# Altium PCB OmniCore_SDR.PcbDoc (part 12 of 13)
Units mil, origin at the board's own origin, x right, y up, seen from the top; angles counter-clockwise.
Board outline 4724.72 x 2755.91 mil, 8 copper layers (Top, GND 1, Layer 1, Layer 2, GND 2, Layer 3, Power, Bottom), stack 40.468 mil thick; 530 components, 427 nets, 2315 pads, 1715 vias.
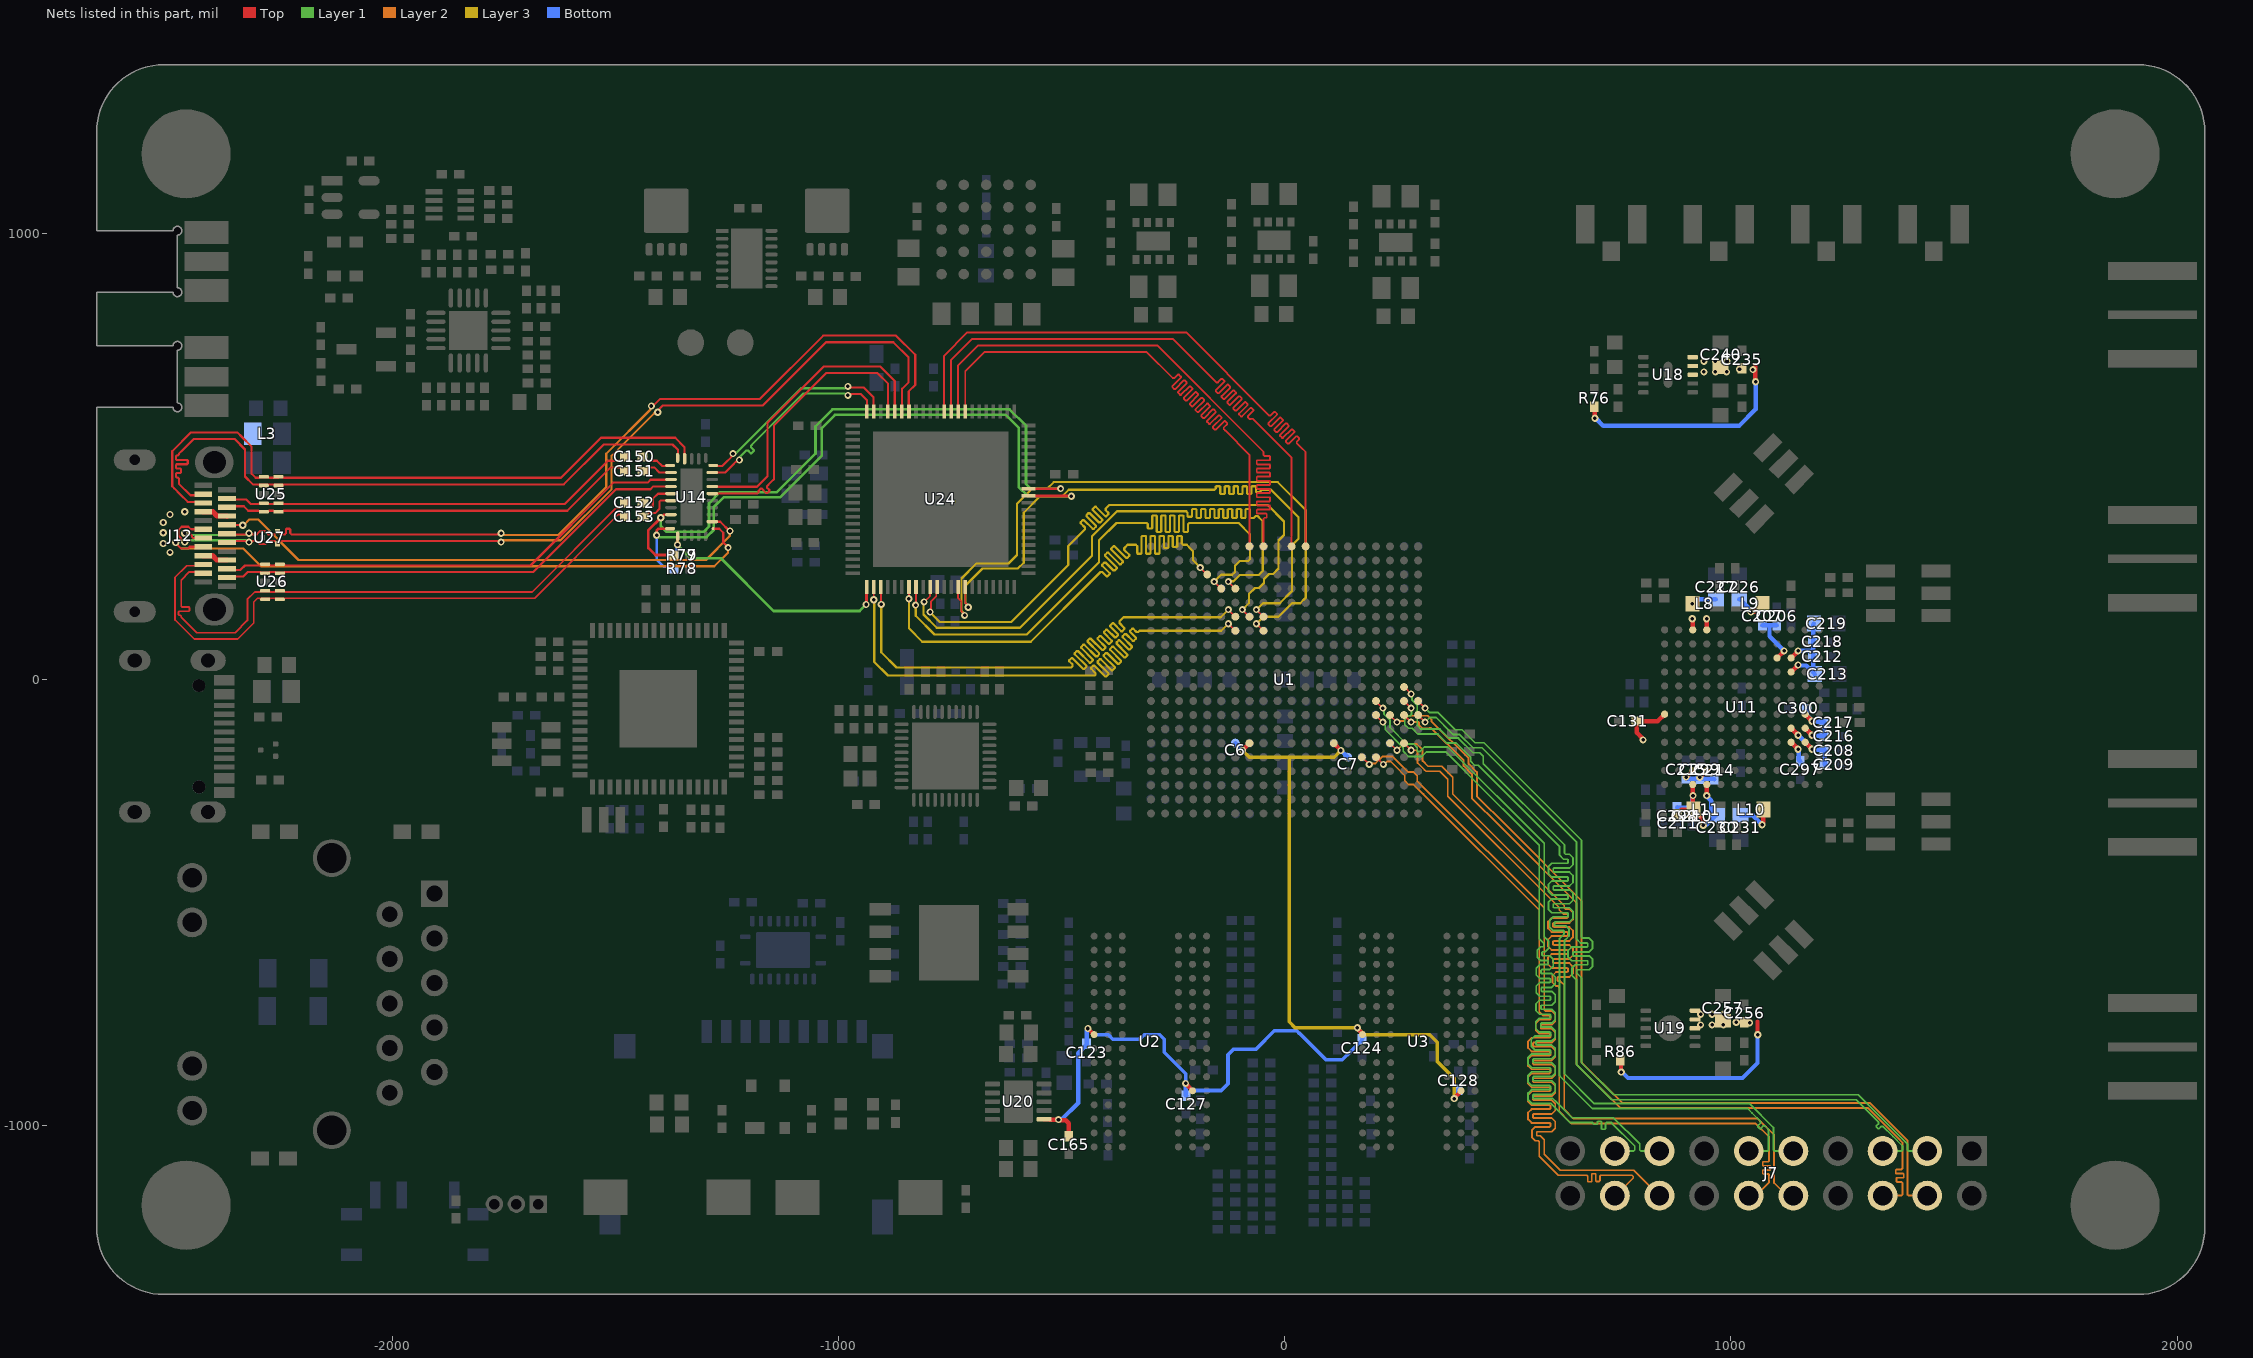
[diagram p17: the nets of this part, all layers, seen from the top]

## Via types
v1: diameter 16, hole 8, Top to Bottom, tented both sides, 1667 vias
v2: diameter 19.68, hole 7.87, Top to Bottom, 44 vias
v3: diameter 200, hole 125, Top to Bottom, 4 vias

## Nets (pads, with @x,y where several pads share a name; then routed paths per layer and width w, separated by ;. In a path a pad name is that pad's centre, name@x,y a point inside that pad or via, vN(x,y) a via of type N, cw(c..) or ccw(c..) an arc to the next point about the centre after c; other vN are vias at no path point) (continued)
UHSIF_DATA28: U1.H20 U24.74 | length 1524.7
  Top w4.2: U24.74@-715.9,600.8 -715.9,691.1 -673,734 -309,734 -252,677 -250.51,675.51 -247.04,675.51 -239.14,683.41 -237.19,683.41 -232.64,678.85 -232.64,676.9 -251.9,657.64 -251.9,655.69 -247.35,651.13 -245.4,651.13 -226.13,670.39 -224.18,670.39 -219.63,665.84 -219.63,663.89 -238.89,644.63 -238.89,642.68 -234.34,638.12 -232.38,638.12 -213.12,657.38 -211.17,657.38 -206.62,652.83 -206.62,650.88 -225.88,631.62 -225.88,629.67 -221.33,625.11 -219.37,625.11 -200.11,644.37 -198.16,644.37 -193.61,639.82 -193.61,637.87 -212.87,618.61 -212.87,616.65 -208.31,612.1 -206.36,612.1 -187.1,631.36 -185.15,631.36 -180.6,626.81 -180.6,624.86 -199.86,605.6 -199.86,603.64 -195.3,599.09 -193.35,599.09 -174.09,618.35 -172.14,618.35 -167.59,613.8 -167.59,611.85 -186.85,592.58 -186.85,590.63 -182.29,586.08 -180.34,586.08 -161.08,605.34 -159.13,605.34 -154.57,600.79 -154.57,598.84 -173.84,579.57 -173.84,577.62 -169.28,573.07 -167.33,573.07 -148.07,592.33 -146.12,592.33 -141.56,587.78 -141.56,585.82 -160.83,566.56 -160.83,564.61 -156.27,560.06 -154.32,560.06 -135.31,579.07 -133.36,579.07 -128.8,574.52 -128.8,572.57 -136.44,564.92 -136.44,561.44 -133.5,558.5 -78.98,503.98 U1.H20@-78.98,298.43
UHSIF_DATA29: U1.J20 U24.75 | length 1524.7
  Top w4.2: U24.75@-731.7,600.8 -731.7,704.3 -687,749 -286,749 -47.49,510.49 -47.49,505.26 -47.49,503.16 -45.03,500.7 -33.87,500.7 -32.49,499.32 -32.49,492.88 -33.87,491.5 -61.11,491.5 -62.49,490.12 -62.49,483.68 -61.11,482.3 -33.87,482.3 -32.49,480.92 -32.49,474.48 -33.87,473.1 -61.11,473.1 -62.49,471.72 -62.49,465.28 -61.11,463.9 -33.87,463.9 -32.49,462.52 -32.49,456.08 -33.87,454.7 -61.11,454.7 -62.49,453.32 -62.49,446.88 -61.11,445.5 -33.87,445.5 -32.49,444.12 -32.49,437.68 -33.87,436.3 -61.11,436.3 -62.49,434.92 -62.49,428.48 -61.11,427.1 -33.87,427.1 -32.49,425.72 -32.49,419.28 -33.87,417.9 -61.11,417.9 -62.49,416.52 -62.49,410.08 -61.11,408.7 -33.87,408.7 -32.49,407.32 -32.49,400.88 -33.87,399.5 -61.11,399.5 -62.49,398.12 -62.49,391.68 -61.11,390.3 -33.87,390.3 -32.49,388.92 -32.49,382.48 -33.87,381.1 -61.11,381.1 -62.49,379.72 -62.49,373.28 -61.11,371.9 -41.47,371.9 -40.09,370.52 -40.09,364.08 -41.47,362.7 -45.03,362.7 -47.49,360.24 -47.49,349 U1.J20@-47.49,298.43
UHSIF_DATA30: U1.L20 U24.76 | length 1524.7
  Top w4.2: U24.76@-747.4,600.8 -747.4,716.6 -701,763 -250,763 -154.51,667.51 -153.03,666.03 -149.55,666.03 -141.66,673.92 -139.71,673.92 -135.15,669.37 -135.15,667.41 -154.42,648.15 -154.42,646.2 -149.86,641.65 -147.91,641.65 -128.65,660.91 -126.7,660.91 -122.14,656.36 -122.14,654.4 -141.4,635.14 -141.4,633.19 -136.85,628.64 -134.9,628.64 -115.64,647.9 -113.69,647.9 -109.13,643.34 -109.13,641.39 -128.39,622.13 -128.39,620.18 -123.84,615.63 -121.89,615.63 -102.63,634.89 -100.68,634.89 -96.12,630.33 -96.12,628.38 -115.38,609.12 -115.38,607.17 -110.83,602.62 -108.88,602.62 -89.62,621.88 -87.66,621.88 -83.11,617.32 -83.11,615.37 -102.37,596.11 -102.37,594.16 -97.82,589.6 -95.87,589.6 -76.61,608.87 -74.65,608.87 -70.1,604.31 -70.1,602.36 -82.31,590.15 -82.31,588.2 -77.76,583.64 -75.81,583.64 -74.96,584.49 -71.49,584.49 -56.5,569.5 -30.5,543.5 15.5,497.5 U1.L20@15.5,298.43
UHSIF_DATA31: U1.M20 U24.77 | length 1524.7
  Top w4.2: U24.77@-763.2,600.8 -763.2,725.8 -711,778 -221,778 -36.55,593.55 -35.06,592.06 -31.59,592.06 -23.69,599.96 -21.74,599.96 -17.19,595.4 -17.19,593.45 -36.45,574.19 -36.45,572.24 -31.9,567.68 -29.95,567.68 -10.68,586.94 -8.73,586.94 -4.18,582.39 -4.18,580.44 -23.44,561.18 -23.44,559.23 -18.89,554.67 -16.93,554.67 2.33,573.93 4.28,573.93 8.83,569.38 8.83,567.43 -10.43,548.17 -10.43,546.22 -5.88,541.66 -3.92,541.66 15.34,560.92 17.29,560.92 21.84,556.37 21.84,554.42 2.58,535.16 2.58,533.2 7.14,528.65 9.09,528.65 25.79,545.36 27.75,545.36 32.3,540.8 32.3,538.85 26.96,533.52 26.96,530.04 37.5,519.5 47,510 U1.M20@47,298.43
UHSIF_EOP#: U1.E18 U24.29 | length 1463.3
  Top w4.2: v1(-842,181) v1(-842,181) -841.95,207.15 U24.29@-841.9,207.2 ; v1(-189.22,251.07) v1(-189.22,251.07) U1.E18@-173.47,235.43 U1.E18@-173.47,235.43
  Layer 3 w5: v1(-842,181) -842,115 -812,85 -569,85 -424,230 -412.91,241.09 -408.77,241.09 -399.21,231.53 -397.08,231.53 -392.14,236.48 -392.14,238.6 -408.84,255.31 -408.84,257.43 -403.89,262.38 -401.77,262.38 -383.61,244.22 -381.49,244.22 -376.54,249.17 -376.54,251.3 -402.7,277.46 -402.7,279.58 -397.76,284.53 -395.63,284.53 -369.47,258.37 -367.35,258.37 -362.4,263.32 -362.4,265.44 -388.56,291.6 -388.56,293.72 -383.61,298.67 -381.49,298.67 -355.33,272.51 -353.21,272.51 -348.26,277.46 -348.26,279.58 -359.27,290.59 -359.27,294.73 -357.5,296.5 -352,302 -340,302 -333.54,302 -330.61,299.07 -330.61,283.5 -329.11,282 -322.11,282 -320.61,283.5 -320.61,320.5 -319.11,322 -312.11,322 -310.61,320.5 -310.61,283.5 -309.11,282 -302.11,282 -300.61,283.5 -300.61,320.5 -299.11,322 -292.11,322 -290.61,320.5 -290.61,283.5 -289.11,282 -282.11,282 -280.61,283.5 -280.61,320.5 -279.11,322 -272.11,322 -270.61,320.5 -270.61,296.29 -269.11,294.79 -262.11,294.79 -260.61,296.29 -260.61,320.5 -259.11,322 -252.11,322 -250.61,320.5 -250.61,298.68 -249.11,297.18 -242.11,297.18 -240.61,298.68 -240.61,320.5 -239.11,322 -232.11,322 -230.61,320.5 -230.61,304.93 -227.68,302 -219.53,302 -211.04,293.51 -205.43,287.9 -205.43,267.28 v1(-189.22,251.07)
UHSIF_OE#: U1.J14 U24.36 | length 1462.9
  Top w4.2: U24.36@-731.7,207.2 -731.7,182.33 -724.9,175.53 -724.9,152.9 -717.26,145.26 v1(-717.26,143.7) ; v1(-63.24,125.2) U1.J14@-47.49,109.45
  Layer 3 w5: v1(-717.26,143.7) -717.26,146.68 -724.5,153.92 -724.5,226.5 -691,260 -619,260 -600,279 -600,394 -567,427 -532.94,427 -517.43,442.51 -15.51,442.51 47,380 47,183 46.57,183 34.79,171.23 16.23,171.23 -14,141 -47.43,141 v1(-63.24,125.2)
UHSIF_RD#: U1.H15 U24.33 | length 1463.9
  Top w4.2: v1(-794.52,151.48) -793,153 -793,174 -780.75,186.25 -780.75,205.35 U24.33@-778.9,207.2 ; v1(-94.73,156.69) U1.H15@-78.98,140.94
  Layer 3 w5: v1(-794.52,151.48) -794.52,150.52 -773,129 -613,129 -485,257 -485,299.29 -454.14,330.14 -447.48,336.81 -447.48,340.95 -457.07,350.54 -457.07,352.66 -452.12,357.61 -450,357.61 -430.12,337.73 -428,337.73 -423.05,342.68 -423.05,344.8 -444.35,366.1 -444.35,368.22 -439.4,373.17 -437.28,373.17 -415.98,351.87 -413.86,351.87 -408.91,356.82 -408.91,358.94 -430.21,380.24 -430.21,382.37 -425.26,387.32 -423.14,387.32 -401.83,366.01 -399.71,366.01 -394.76,370.96 -394.76,373.09 -400.91,379.23 -400.91,383.38 -399.14,385.14 -393.29,391 -38,391 -1.5,354.5 -1.5,324 -13.62,311.88 -13.62,248.8 -25.73,236.68 -35.25,236.68 -46.37,225.56 -46.37,216.31 -57.49,205.18 -66.75,205.18 -80.23,191.7 -80.23,171.19 v1(-94.73,156.69)
UHSIF_RDNE: U1.G17 U24.32 | length 1463.3
  Top w4.2: v1(-808,174) -794.7,187.3 U24.32@-794.7,207.2 ; v1(-126.23,219.68) U1.G17@-110.48,203.94
  Layer 3 w5: v1(-808,174) -809.5,172.5 -809.5,145.96 -779.54,116 -593.22,116 -432,277.22 -432,321 -376,377 -352,377 -220.5,377 -217.57,374.07 -217.57,366.65 -216.07,365.15 -209.07,365.15 -207.57,366.65 -207.57,380.5 -206.07,382 -199.07,382 -197.57,380.5 -197.57,363.5 -196.07,362 -189.07,362 -187.57,363.5 -187.57,380.5 -186.07,382 -179.07,382 -177.57,380.5 -177.57,363.5 -176.07,362 -169.07,362 -167.57,363.5 -167.57,380.5 -166.07,382 -159.07,382 -157.57,380.5 -157.57,363.5 -156.07,362 -149.07,362 -147.57,363.5 -147.57,380.5 -146.07,382 -139.07,382 -137.57,380.5 -137.57,363.5 -136.07,362 -129.07,362 -127.57,363.5 -127.57,380.5 -126.07,382 -119.07,382 -117.57,380.5 -117.57,363.5 -116.07,362 -109.07,362 -107.57,363.5 -107.57,380.5 -106.07,382 -99.07,382 -97.57,380.5 -97.57,363.5 -96.07,362 -89.07,362 -87.57,363.5 -87.57,380.5 -86.07,382 -79.07,382 -77.57,380.5 -77.57,363.5 -76.07,362 -69.07,362 -67.57,363.5 -67.57,363.57 -64.64,366.5 -60.5,366.5 -58,364 -49,355 -49,243.12 -57.93,234.18 -100.99,234.18 -114.9,220.28 -125.64,220.28 v1(-126.23,219.68)
UHSIF_SEL0: U1.G14 U24.24 | length 1463.4
  Top w4.2: v1(-921.04,179.04) -920.82,179.26 -920.82,206.98 U24.24@-920.6,207.2 ; v1(-126.23,125.2) U1.G14@-110.48,109.45
  Layer 3 w5: v1(-921.04,179.04) -919.54,177.54 -919.54,39.54 -889,9 -615.51,9 -615.37,9.13 -603.36,9.13 -603.23,9 -426,9 -424.23,10.77 -424.23,14.91 -433.59,24.27 -433.59,26.39 -428.64,31.34 -426.52,31.34 -402.01,6.83 -399.89,6.83 -394.94,11.78 -394.94,13.9 -419.45,38.41 -419.45,40.54 -414.5,45.49 -412.38,45.49 -387.87,20.97 -385.74,20.97 -380.8,25.92 -380.8,28.04 -405.31,52.56 -405.31,54.68 -400.36,59.63 -398.24,59.63 -373.72,35.11 -371.6,35.11 -366.65,40.06 -366.65,42.18 -391.17,66.7 -391.17,68.82 -386.22,73.77 -384.1,73.77 -359.58,49.26 -357.46,49.26 -352.51,54.2 -352.51,56.33 -377.03,80.84 -377.03,82.96 -372.08,87.91 -369.95,87.91 -349.26,67.22 -347.14,67.22 -342.19,72.17 -342.19,74.29 -362.88,94.98 -362.88,97.1 -357.93,102.05 -355.81,102.05 -340.5,86.74 -338.37,86.74 -333.42,91.69 -333.42,93.81 -346.68,107.06 -346.68,109.19 -341.73,114.14 -339.61,114.14 -332.31,106.83 -328.17,106.83 -325.5,109.5 -141.93,109.5 v1(-126.23,125.2)
UHSIF_SEL1: U1.G15 U24.25 | length 1463.5
  Top w4.2: U24.25@-904.9,207.2 -904.46,206.76 -904.46,168.96 v1(-904.03,168.53) ; v1(-126.23,156.69) U1.G15@-110.48,140.94
  Layer 3 w5: v1(-904.03,168.53) -904.03,61.03 -870,27 -503,27 -478.67,27 -475.74,29.93 -475.74,34.07 -482.69,41.02 -482.69,43.14 -477.74,48.09 -475.62,48.09 -451.18,23.66 -449.06,23.66 -444.11,28.6 -444.11,30.73 -470.27,56.89 -470.27,59.01 -465.32,63.96 -463.2,63.96 -437.04,37.8 -434.92,37.8 -429.97,42.75 -429.97,44.87 -456.13,71.03 -456.13,73.15 -451.18,78.1 -449.06,78.1 -422.9,51.94 -420.78,51.94 -415.83,56.89 -415.83,59.01 -441.99,85.17 -441.99,87.3 -437.04,92.24 -434.92,92.24 -408.76,66.08 -406.63,66.08 -401.68,71.03 -401.68,73.15 -419.2,90.67 -419.2,92.79 -414.25,97.74 -412.13,97.74 -394.61,80.22 -392.49,80.22 -387.54,85.17 -387.54,87.29 -405.06,104.81 -405.06,106.93 -400.11,111.88 -397.99,111.88 -380.47,94.37 -378.35,94.37 -373.4,99.32 -373.4,101.44 -390.91,118.95 -390.91,121.07 -385.96,126.02 -383.84,126.02 -366.33,108.51 -364.21,108.51 -359.26,113.46 -359.26,115.58 -370.27,126.59 -370.27,130.73 -368.5,132.5 -361.3,139.7 -143.22,139.7 v1(-126.23,156.69)
UHSIF_WR#: U1.J15 U24.37 | length 1463.3
  Top w4.2: U24.37@-715.9,207.2 -715.9,172.09 -709,165.19 v1(-709,162) ; v1(-63.24,156.69) U1.J15@-47.49,140.94
  Layer 3 w5: v1(-709,162) -709,164.98 -715.1,171.07 -715.1,210.9 -677,249 -598,249 -585,262 -585,374 -548.22,410.78 -498.73,410.78 -484.01,425.5 -159.82,425.5 -157.32,425.5 -154.39,428.43 -154.39,432.01 -152.89,433.51 -145.89,433.51 -144.39,432.01 -144.39,417.5 -142.89,416 -135.89,416 -134.39,417.5 -134.39,432.01 -132.89,433.51 -125.89,433.51 -124.39,432.01 -124.39,417.5 -122.89,416 -115.89,416 -114.39,417.5 -114.39,432.01 -112.89,433.51 -105.89,433.51 -104.39,432.01 -104.39,417.5 -102.89,416 -95.89,416 -94.39,417.5 -94.39,432.01 -92.89,433.51 -85.89,433.51 -84.39,432.01 -84.39,417.5 -82.89,416 -75.89,416 -74.39,417.5 -74.39,432.01 -72.89,433.51 -65.89,433.51 -64.39,432.01 -64.39,421.08 -62.89,419.58 -55.89,419.58 -54.39,421.08 -54.39,422.57 -51.46,425.5 -44,425.5 -30.5,425.5 31,364 31,315.75 16.5,301.25 16.5,198.5 -10.81,171.19 -48.74,171.19 v1(-63.24,156.69)
UHSIF_WRNF: U1.F17 U24.30 | length 1463.4
  Top w4.2: v1(-827,167) -826.6,167.4 -826.6,206.8 U24.30@-826.2,207.2 ; v1(-157.72,219.68) U1.F17@-141.98,203.94
  Layer 3 w5: v1(-827,167) -827,143 -785,101 -578,101 -416,263 -416,312 -377,351 -361,351 -309.79,351 -306.86,348.07 -306.86,339.85 -305.36,338.35 -298.36,338.35 -296.86,339.85 -296.86,366.5 -295.36,368 -288.36,368 -286.86,366.5 -286.86,332.5 -285.36,331 -278.36,331 -276.86,332.5 -276.86,366.5 -275.36,368 -268.36,368 -266.86,366.5 -266.86,332.5 -265.36,331 -258.36,331 -256.86,332.5 -256.86,366.5 -255.36,368 -248.36,368 -246.86,366.5 -246.86,332.5 -245.36,331 -238.36,331 -236.86,332.5 -236.86,366.5 -235.36,368 -228.36,368 -226.86,366.5 -226.86,332.5 -225.36,331 -218.36,331 -216.86,332.5 -216.86,348.07 -213.93,351 -211.43,351 -108.93,351 -103,351 -78,326 -78,268.93 -81.35,265.57 -100.74,265.57 -111.43,254.88 -111.43,240.57 -117.32,234.68 -142.73,234.68 v1(-157.72,219.68)
USB3_CC1: J12.A5 U14.2 | length 1252
  Top w5: J12.A5@-2370.31,346.69 -2369.97,346.34 -2335.35,346.34 v1(-2335,346) ; U14.2@-1282.72,353.88 -1264.88,353.88 -1244,333 v1(-1243,333)
  Layer 2 w5: v1(-2335,346) -2333,346 -2320.5,358.5 -2300.5,358.5 -2210,268 -1297,268 -1243.46,321.54 -1243.46,332.54 v1(-1243,333)
USB3_CC2: J12.B5 U14.1 | length 1417.5
  Top w5: v1(-2484.97,306.83) -2484.97,305.63 -2472.84,293.5 -2457.81,293.5 -2453.84,297.47 J12.B5@-2423.45,297.47 ; U14.1@-1280.73,338.13 -1267.13,338.13 -1258,329 -1258,307.02 -1247.3,296.32 v1(-1247.3,295.8)
  Layer 2 w5: v1(-2484.97,306.83) -2484.97,305.63 -2472.84,293.5 -2333.5,293.5 -2294,254 -1278.1,254 -1247.76,284.34 -1247.76,295.34 v1(-1247.3,295.8)
USB3_INT: R79.1 U14.23 U24.57 | length 1489.7
  Top w4.2: U24.57@-574.2,427.6 U24.57@-574,427.8 ; v1@-502.21,427.8 v1(-502.01,428.01)
  Top w6: U14.23@-1375.28,369.63 -1375.58,369.33 -1391.37,369.33 -1398,362.7 v1(-1398.1,362.7) -1425.9,334.9 -1425.9,294.5 -1410.4,279 R79.1@-1370.68,279 ; U24.57@-574,427.8 v1@-502.21,427.8
  Layer 1 w6: v1(-1398.1,362.7) -1398.1,343.9 -1385.2,331 -1301.9,331 -1290,342.9 -1290,395 -1265.05,419.95 -1137.95,419.95 -1051.5,506.4 -1051.5,567.5 -1013.4,605.6 -616.2,605.6 -579.7,569.1 -579.7,438.6 -569.11,428.01 v1(-502.01,428.01)
USB3_RX1_N: J12.B10 U14.14 U25.1 U25.10 | length 1492.7
  Top w4.8: J12.B10@-2423.45,395.9 -2425.89,398.34 -2458.27,398.34 -2475.47,415.53 -2488.67,428.73 -2493,433.07 -2493,511.93 -2450.93,554 -2347.07,554 -2336.53,543.47 -2315,521.93 -2315,461.09 -2306.08,452.17 -2299.29,452.17 -2298.38,453.08 -2289.29,453.08 U25.1@-2287.76,454.61 -2286.22,453.08 -2277.13,453.08 -2276.22,452.17 -2266.42,452.17 ; U25.10@-2254.88,452.17 -2266.42,452.17 ; U25.10@-2254.88,454.61 -2256.42,453.08 -2265.51,453.08 -2266.42,452.17 ; U25.10@-2253.34,453.08 -2244.25,453.08 -2243.35,452.17 -1621.76,452.17 -1532.13,541.8 -1365.65,541.8 -1344.85,521 -1344.85,494.75 U14.14@-1344.75,494.65
USB3_RX1_P: J12.B11 U14.15 U25.2 U25.9 | length 1491.5
  Top w4.8: J12.B11@-2423.45,415.58 -2425.89,413.14 -2452.14,413.14 -2478.2,439.2 -2478.2,448 -2478.2,450.4 -2481.01,453.21 -2482.73,453.21 -2484.2,454.68 -2484.2,461.54 -2482.73,463.01 -2474.73,463.01 -2473.26,464.48 -2473.26,471.34 -2474.73,472.81 -2482.73,472.81 -2484.2,474.28 -2484.2,481.14 -2482.73,482.61 -2459.67,482.61 -2458.2,484.08 -2458.2,490.94 -2459.67,492.41 -2482.73,492.41 -2484.2,493.88 -2484.2,500.74 -2482.73,502.21 -2481.01,502.21 -2478.2,505.02 -2478.2,505.8 -2470.1,513.9 -2444.8,539.2 -2353.2,539.2 -2329.8,515.8 -2329.8,454.96 -2312.21,437.37 -2299.29,437.37 -2298.38,436.47 -2289.29,436.47 U25.2@-2287.76,434.93 -2286.22,436.47 -2277.13,436.47 -2276.22,437.37 -2266.42,437.37 ; U25.9@-2254.88,434.93 -2256.42,436.47 -2265.51,436.47 -2266.42,437.37 ; U25.9@-2254.88,437.37 -2266.42,437.37 ; U25.9@-2253.34,436.47 -2244.25,436.47 -2243.35,437.37 -1615.63,437.37 -1526,527 -1371.78,527 -1359.65,514.86 -1359.65,506.69 -1359.96,506.37 -1359.96,497.17 U14.15@-1360.5,496.64
USB3_RX2_N: J12.A10 U14.18 U26.1 U26.10 | length 1084
  Top w4.8: J12.A10@-2370.31,248.26 -2367.87,245.82 -2339.92,245.82 -2329.94,255.8 -2296.29,255.8 -2295.38,256.71 -2286.29,256.71 U26.1@-2284.76,258.24 -2283.22,256.71 -2274.13,256.71 -2273.22,255.8 -2263.42,255.8 -2262.51,256.71 -2253.42,256.71 U26.10@-2251.88,258.24 -2250.34,256.71 -2241.25,256.71 -2240.35,255.8 -1690.2,255.8 -1504.53,441.47 -1427.47,441.47 -1421.03,447.9 -1375.75,447.9 U14.18@-1375.28,448.37
USB3_RX2_P: J12.A11 U14.19 U26.2 U26.9 | length 1084
  Top w4.8: J12.A11@-2370.31,228.58 -2367.87,231.02 -2333.79,231.02 -2323.81,241 -2296.29,241 -2295.38,240.1 -2286.29,240.1 U26.2@-2284.76,238.56 -2283.22,240.1 -2274.13,240.1 -2273.22,241 -2263.42,241 -2262.51,240.1 -2253.42,240.1 U26.9@-2251.88,238.56 -2250.34,240.1 -2241.25,240.1 -2240.35,241 -1684.07,241 -1498.4,426.67 -1421.33,426.67 -1414.9,433.1 -1375.75,433.1 U14.19@-1375.28,432.62
USB3_SCL: R77.2 U14.26 U24.23 | length 578.1
  Top w4.2: v1(-937.93,168.32) v1@-937,169.25 ; U24.23@-937,206.6 U24.23@-936.4,207.2
  Top w6: v1(-1360.7,302.1) -1360.6,302.2 -1360.6,321.26 U14.26@-1360.5,321.36 ; v1@-937,169.25 U24.23@-937,206.6
  Layer 1 w6: v1(-1360.7,302.1) -1360.7,301 -1331.6,271.9 -1263.6,271.9 -1145.5,153.8 -952.45,153.8 v1(-937.93,168.32)
  Bottom w6: R77.2@-1370.69,279 -1368.72,279 -1361.87,285.84 -1361.87,300.93 v1(-1360.7,302.1)
USB3_SDA: R78.2 U14.25 U24.56 | length 1503.4
  Top w4.2: U24.56@-574.2,411.9 U24.56@-573.75,411.45 ; v1@-478.45,411.45 v1(-478,411)
  Top w6: v1(-1407.4,323.5) -1406.9,324 -1406.9,334.62 -1403.39,338.13 U14.25@-1377.27,338.13 ; U24.56@-573.75,411.45 v1@-478.45,411.45
  Layer 1 w6: v1(-1407.4,323.5) -1407.4,323.01 -1403.59,319.2 -1295.3,319.2 -1279.45,335.05 -1279.45,386.45 -1257.4,408.5 -1131.1,408.5 -1037.1,502.5 -1037.1,564 -1007.8,593.3 -624.8,593.3 -596,564.5 -596,431.3 -575.7,411 v1(-478,411)
  Bottom w6: v1(-1407.4,323.5) -1407.4,269.3 -1390.9,252.8 -1375.49,252.8 R78.2@-1370.69,248
USB3_SSRX_N: U14.10 U24.87 | length 478.4
  Top w4.8: U14.10@-1280.73,479.87 -1280.2,479.33 -1271,479.33 -1270.68,479.02 -1259.86,479.02 -1252.38,486.5 -1240.39,498.49 -1240.39,499.14 -1236.28,503.25 v1(-1236.28,506.28) ; v1(-979,657) -976.86,654.86 -971.05,654.86 -970.59,654.4 -943.26,654.4 -921.1,632.24 -921.1,601.3 U24.87@-920.6,600.8
  Layer 1 w4.9: v1(-1236.28,506.28) -1235.44,505.44 -1231.38,505.44 -1083.88,652.95 -986.05,652.95 -982,657 v1(-979,657)
USB3_SSRX_P: U14.9 U24.88 | length 478.2
  Top w4.8: U14.9@-1282.72,464.12 -1282.62,464.22 -1253.73,464.22 -1237.58,480.37 -1229.92,488.03 -1229.28,488.03 -1225.17,492.14 v1(-1222.14,492.14) ; v1(-979,637) -976.86,639.14 -971.05,639.14 -970.59,639.6 -949.39,639.6 -935.9,626.11 -935.9,601.3 U24.88@-936.4,600.8
  Layer 1 w4.9: v1(-1222.14,492.14) -1222.14,496.2 -1222.97,497.03 -1209.5,510.5 -1206.79,513.21 -1202.73,513.21 -1196.88,507.35 -1194.78,507.35 -1189.88,512.25 -1189.88,514.35 -1195.73,520.21 -1195.73,524.27 -1194,526 -1078.95,641.05 -986.05,641.05 -982,637 v1(-979,637)
USB3_SSTX_N: U14.7 U24.84 | length 673.1
  Top w4.8: U14.7@-1282.72,432.62 -1282.25,432.15 -1182.65,432.15 -1159,455.8 -1159,575.93 -1033.13,701.8 -906.57,701.8 -873.9,669.13 -873.9,601.3 U24.84@-873.4,600.8
USB3_SSTX_P: U14.6 U24.85 | length 673.1
  Top w4.8: U14.6@-1282.72,416.87 -1282.25,417.35 -1187.93,417.35 -1181.75,417.35 -1178.93,420.16 -1178.93,423.42 -1174.08,428.27 -1172,428.27 -1161.59,417.86 -1159.51,417.86 -1154.66,422.71 -1154.66,424.79 -1159.88,430.01 -1159.88,433.99 -1151.43,442.43 -1144.2,449.67 -1144.2,569.8 -1027,687 -912.7,687 -888.7,663 -888.7,601.3 U24.85@-889.2,600.8
USB3_TX1_1_N: C151.2 U14.17 | length 71.4
  Top w4.8: C151.2@-1438.31,467 -1430.87,474.44 -1427.25,474.44 -1426.09,475.6 -1413.01,475.6 -1401.62,464.22 -1375.38,464.22 U14.17@-1375.28,464.12
USB3_TX1_1_P: C150.2 U14.16 | length 69.7
  Top w4.8: C150.2@-1438.31,499 -1430.87,491.56 -1427.25,491.56 -1426.09,490.4 -1406.88,490.4 -1395.49,479.02 -1387.32,479.02 -1387,479.33 -1377.8,479.33 U14.16@-1377.27,479.87
USB3_TX1_N: C151.1 J12.A3 U25.5 U25.6 | length 945.8
  Top w4.8: J12.A3@-2370.31,386.05 -2367.86,388.49 -2332.85,388.49 -2322.67,378.32 -2299.29,378.32 -2298.38,377.41 -2289.29,377.41 U25.5@-2287.76,375.87 -2286.22,377.41 -2277.13,377.41 -2276.22,378.32 -2266.42,378.32 -2265.51,377.41 -2256.42,377.41 U25.6@-2254.88,375.87 -2253.34,377.41 -2244.25,377.41 -2243.35,378.32 -1607.75,378.32 -1510.47,475.6 -1489.91,475.6 -1488.75,474.44 -1485.13,474.44 C151.1@-1477.68,467
USB3_TX1_P: C150.1 J12.A2 U25.4 U25.7 | length 945.8
  Top w4.8: J12.A2@-2370.31,405.74 -2367.86,403.3 -2326.72,403.3 -2316.54,393.12 -2299.29,393.12 -2298.38,394.02 -2289.29,394.02 U25.4@-2287.76,395.56 -2286.22,394.02 -2277.13,394.02 -2276.22,393.12 -2266.42,393.12 -2265.51,394.02 -2256.42,394.02 U25.7@-2254.88,395.56 -2253.34,394.02 -2244.25,394.02 -2243.35,393.12 -1613.88,393.12 -1516.6,490.4 -1489.91,490.4 -1488.75,491.56 -1485.13,491.56 C150.1@-1477.68,499
USB3_TX2_1_N: C153.2 U14.21 | length 87.7
  Top w4.8: C153.2@-1438,365 -1430.56,372.44 -1426.43,372.44 -1425.78,373.1 -1410.5,373.1 -1401.25,382.35 -1401.25,398.79 -1398.44,401.6 -1375.75,401.6 U14.21@-1375.28,401.13
USB3_TX2_1_P: C152.2 U14.20 | length 87.7
  Top w4.8: C152.2@-1438,396 -1430.56,388.56 -1426.43,388.56 -1425.78,387.9 -1416.63,387.9 -1416.05,388.48 -1416.05,404.92 -1404.57,416.4 -1375.75,416.4 U14.20@-1375.28,416.87
USB3_TX2_N: C153.1 J12.B3 U26.5 U26.6 | length 1347.7
  Top w4: J12.B3@-2423.45,258.1 -2426.29,255.26 -2460.48,255.26 -2487,228.74 -2487,134.2 -2482.9,130.1 -2443.8,91 -2346.34,91 -2310.43,126.91 -2310.43,173.79 -2301.88,182.35 -2296.22,182.35 -2295.32,181.44 -2286.69,181.44 U26.5@-2284.76,179.5 -2282.82,181.44 -2274.2,181.44 -2273.29,182.35 -2263.35,182.35 -2262.44,181.44 -2253.82,181.44 U26.6@-2251.88,179.5 -2249.94,181.44 -2241.32,181.44 -2240.42,182.35 -1680.68,182.35 -1492.84,370.19 -1482.56,370.19 C153.1@-1477.37,365
USB3_TX2_P: C152.1 J12.B2 U26.4 U26.7 | length 1347.7
  Top w4: J12.B2@-2423.45,238.42 -2426.29,241.26 -2454.69,241.26 -2473,222.95 -2473,210 -2473,164.69 -2470.66,162.34 -2455.57,162.34 -2454.22,160.99 -2454.22,154.69 -2455.57,153.34 -2477.65,153.34 -2479,151.99 -2479,145.69 -2477.65,144.34 -2475.34,144.34 -2473,142 -2473,140 -2438,105 -2352.14,105 -2324.43,132.7 -2324.43,179.59 -2307.68,196.35 -2296.22,196.35 -2295.32,197.25 -2286.69,197.25 U26.4@-2284.76,199.19 -2282.82,197.25 -2274.2,197.25 -2273.29,196.35 -2263.35,196.35 -2262.44,197.25 -2253.82,197.25 U26.7@-2251.88,199.19 -2249.94,197.25 -2241.32,197.25 -2240.42,196.35 -1686.48,196.35 -1498.64,384.19 -1491.15,384.19 -1479.34,396 C152.1@-1477.37,396
USB3_VBUS: J12.A4 J12.A9 J12.B4 J12.B9 L3.1 | length 114.4
  Top w12: J12.B4@-2423.45,277.79 -2423.36,277.7 -2402.86,277.7 -2393.21,268.04 -2370.4,268.04 J12.A9@-2370.31,267.95 ; J12.B9@-2423.45,376.21 -2423.36,376.12 -2402.12,376.12 -2392.46,366.46 -2370.4,366.46 J12.A4@-2370.31,366.37
  other v1: -2498,285 -2513,305 -2513,329 -2513,352 -2498,370 -2465,376
USB3D_N: J12.A7 J12.B7 U24.83 U27.1 | length 2132.7
  Top w4.8: v1(-2465,308) -2465.36,308 -2479,321.64 -2479,323.6 -2479.4,324 -2479.4,334.6 -2471.6,342.4 -2456.87,342.4 -2451.32,336.85 J12.B7@-2423.45,336.85 ; J12.A7@-2370.31,307.32 -2367.03,310.6 -2329.41,310.6 ; v1(-2321,308) -2318.86,310.14 -2313.05,310.14 -2312.59,310.6 -2303.7,310.6 -2296.7,303.6 -2284.77,303.6 -2277.77,310.6 -2263.59,310.6 -2260.77,307.79 -2260.77,307.73 U27.1@-2257.27,304.22 -2253.76,307.73 -2253.76,307.79 -2250.95,310.6 -2218.2,310.6 -2218.15,310.65 -1764.41,310.65 -1763.95,310.19 -1758.14,310.19 v1(-1756,308.05) ; -1400.89,606.79 -1393.48,614.2 -1169.8,614.2 -1028,756 -877,756 -842.8,721.8 -842.8,666.33 -857.2,651.93 -857.2,601.3 U24.83@-857.7,600.8
  Layer 1 w4.9: v1(-2465,308) -2465,309.18 -2462.13,312.05 -2328.05,312.05 -2324,308 v1(-2321,308)
  Layer 2 w4.9: v1@-1751,312.1 -1697.63,312.1 -1623,312.1 -1508.26,426.84 -1508.26,501.46 -1412.85,596.88 -1407.12,596.88 v1(-1405,599)
USB3D_P: J12.A6 J12.B6 U24.82 U27.2 | length 2132.7
  Top w4.8: v1(-2465,328) -2462.86,325.86 -2451.81,325.86 -2449,323.05 -2449,320 -2446.16,317.16 J12.B6@-2423.45,317.16 ; J12.A6@-2370.31,327 -2368.71,325.4 -2329.41,325.4 ; v1(-2321,328) -2318.86,325.86 -2313.05,325.86 -2312.59,325.4 -2303.7,325.4 -2296.7,332.4 -2284.77,332.4 -2277.77,325.4 -2263.59,325.4 -2260.77,328.21 -2260.77,328.27 U27.2@-2257.27,331.78 -2253.76,328.27 -2253.76,328.21 -2250.95,325.4 -2243.4,325.4 -2241,325.4 -2238.19,328.21 -2238.19,336.54 -2236.72,338.01 -2229.86,338.01 -2228.39,336.54 -2228.39,328.21 -2225.58,325.4 -2224.33,325.4 -2224.28,325.45 -2198,325.45 -1764.41,325.45 -1763.95,325.91 -1758.14,325.91 v1(-1756,328.05) ; -1411.36,617.25 -1399.61,629 -1175.93,629 -1034.13,770.8 -870.87,770.8 -828,727.93 -828,660.2 -842.4,645.8 -842.4,601.3 U24.82@-841.9,600.8
  Layer 1 w4.9: v1(-2465,328) -2462.13,325.13 -2462.13,323.95 -2328.05,323.95 -2324,328 v1(-2321,328)
  Layer 2 w4.9: v1@-1751,324 -1627.93,324 -1520.16,431.77 -1520.16,506.39 -1421.27,605.29 -1421.27,611.02 v1(-1419.14,613.14)
USER_IO1_N: J7.5 U1.Y8 | length 1989.8
  Top w4.2: U1.Y8@298.97,-79.53 v1(314.72,-95.28)
  Layer 1 w4: v1(314.72,-95.28) 324.96,-85.03 339.63,-85.03 373.7,-119.1 377.8,-123.2 392.57,-123.2 421.97,-152.6 442.1,-152.6 654.1,-364.6 654.1,-571.7 654.1,-581.48 662.89,-590.27 677.75,-590.27 679.1,-591.62 679.1,-597.92 677.75,-599.27 642.89,-599.27 635.1,-607.06 635.1,-622.47 642.89,-630.27 677.75,-630.27 679.1,-631.62 679.1,-637.92 677.75,-639.27 651.37,-639.27 643.58,-647.06 643.58,-662.47 651.37,-670.27 651.76,-670.27 654.1,-672.61 654.1,-679.43 654.1,-863.16 732.54,-941.6 1280.91,-941.6 1323.16,-983.84 1330.93,-991.62 1330.93,-994.94 1325.57,-1000.3 1325.57,-1002.21 1330.03,-1006.66 1331.94,-1006.66 1337.3,-1001.3 1340.61,-1001.3 1363.16,-1023.84 1384.5,-1045.19 1384.5,-1054.16 1382.16,-1056.5 J7.5@1340,-1056.5
USER_IO1_P: J7.3 U1.Y9 | length 1989.8
  Top w4.2: U1.Y9@298.97,-48.03 v1(314.72,-63.78)
  Layer 1 w4: v1(314.72,-63.78) 324.96,-74.03 344.18,-74.03 382.62,-112.47 397.39,-112.47 426.53,-141.6 446.66,-141.6 665.1,-360.04 665.1,-571.7 665.1,-576.92 667.44,-579.27 682.31,-579.27 690.1,-587.06 690.1,-602.47 682.31,-610.27 647.45,-610.27 646.1,-611.62 646.1,-617.92 647.45,-619.27 682.31,-619.27 690.1,-627.06 690.1,-642.47 682.31,-650.27 655.93,-650.27 654.58,-651.62 654.58,-657.92 655.93,-659.27 656.31,-659.27 665.1,-668.05 665.1,-679.43 665.1,-858.6 737.1,-930.6 1285.47,-930.6 1395.5,-1040.63 1395.5,-1054.16 1397.84,-1056.5 J7.3@1440,-1056.5
USER_IO2_N: J7.6 U1.W8 | length 1985.6
  Top w4.2: U1.W8@267.47,-79.53 v1(283.22,-95.28)
  Layer 2 w4.2: v1(283.22,-95.28) 283.29,-95.21 299.75,-95.21 300.62,-96.08 300.62,-101.12 308.88,-109.38 324.12,-109.38 324.96,-108.54 328.44,-108.54 401,-181.1 401,-193.4 419.6,-212 419.6,-265.8 483,-329.2 654,-500.2 654,-861.94 752.06,-960 1307,-960 1376.9,-1029.9 1384.4,-1037.4 1384.4,-1084.25 1384.4,-1095.55 1381.94,-1098.01 1370.78,-1098.01 1369.4,-1099.39 1369.4,-1105.83 1370.78,-1107.21 1386.02,-1107.21 1387.4,-1108.59 1387.4,-1115.03 1386.02,-1116.41 1372.13,-1116.41 1370.75,-1117.79 1370.75,-1124.23 1372.13,-1125.61 1381.94,-1125.61 1384.4,-1128.07 1384.4,-1145.9 1384.4,-1154.04 1381.94,-1156.5 J7.6@1340,-1156.5
USER_IO2_P: J7.4 U1.V8 | length 1985.6
  Top w4.2: U1.V8@235.98,-79.53 v1(251.72,-95.28)
  Layer 2 w4.2: v1(251.72,-95.28) 253.98,-93.02 265.54,-93.02 277.38,-81.18 320.56,-81.18 328.82,-89.44 328.82,-93.14 333.02,-97.34 333.08,-97.34 412.2,-176.46 412.2,-188.76 430.8,-207.36 430.8,-261.16 498.84,-329.2 665.2,-495.56 665.2,-857.3 756.7,-948.8 1311.64,-948.8 1384.82,-1021.98 1395.6,-1032.76 1395.6,-1154.04 1398.06,-1156.5 J7.4@1440,-1156.5
USER_IO3_N: J7.11 U1.W9 | length 1989.8
  Top w4.2: U1.W9@267.47,-48.03 v1(283.22,-63.78)
  Layer 1 w4: v1(283.22,-63.78) 284.08,-64.64 284.08,-78.93 281.73,-81.28 277.42,-81.28 269.22,-89.48 269.22,-101.07 277.42,-109.28 285.52,-109.28 298.25,-122 343.4,-122 363.6,-142.2 384.7,-142.2 416.85,-174.35 416.85,-183.45 425.4,-192 433.45,-192 616.1,-374.65 616.1,-383.9 616.1,-393.68 624.89,-402.47 633.75,-402.47 635.1,-403.82 635.1,-410.12 633.75,-411.47 598.89,-411.47 591.1,-419.26 591.1,-434.67 598.89,-442.47 633.75,-442.47 635.1,-443.82 635.1,-450.12 633.75,-451.47 598.89,-451.47 591.1,-459.26 591.1,-474.67 598.89,-482.47 633.75,-482.47 635.1,-483.82 635.1,-490.12 633.75,-491.47 598.89,-491.47 591.1,-499.26 591.1,-514.67 598.89,-522.47 633.75,-522.47 635.1,-523.82 635.1,-530.12 633.75,-531.47 601.63,-531.47 593.84,-539.26 593.84,-554.67 601.63,-562.47 624.89,-562.47 626.24,-563.82 626.24,-570.12 624.89,-571.47 616.1,-580.25 616.1,-614.3 616.1,-887.96 619.32,-891.18 683.02,-954.88 689.42,-961.28 1037.32,-961.28 1047.27,-971.23 1066.46,-990.41 1066.46,-993.73 1060.17,-1000.01 1060.17,-1001.92 1064.63,-1006.38 1066.54,-1006.38 1072.82,-1000.09 1076.14,-1000.09 1077.55,-1001.51 1084.5,-1008.46 1084.5,-1054.16 1082.16,-1056.5 J7.11@1040,-1056.5
USER_IO3_P: J7.9 U1.W10 | length 1989.8
  Top w4.2: U1.W10@267.47,-16.54 v1(283.22,-32.28)
  Layer 1 w4: v1(283.22,-32.28) 285.52,-34.58 285.52,-46.28 297.22,-57.98 297.22,-69.58 296.73,-70.06 295.08,-71.72 295.08,-78.93 297.22,-81.08 297.22,-102.91 305.31,-111 347.96,-111 368.16,-131.2 389.26,-131.2 422.06,-164 437,-164 445.2,-172.2 445.2,-183.8 445.18,-188.18 627.1,-370.09 627.1,-383.9 627.1,-389.12 629.44,-391.47 638.31,-391.47 646.1,-399.26 646.1,-414.67 638.31,-422.47 603.45,-422.47 602.1,-423.82 602.1,-430.12 603.45,-431.47 638.31,-431.47 646.1,-439.26 646.1,-454.67 638.31,-462.47 603.45,-462.47 602.1,-463.82 602.1,-470.12 603.45,-471.47 638.31,-471.47 646.1,-479.26 646.1,-494.67 638.31,-502.47 603.45,-502.47 602.1,-503.82 602.1,-510.12 603.45,-511.47 638.31,-511.47 646.1,-519.26 646.1,-534.67 638.31,-542.47 606.19,-542.47 604.84,-543.82 604.84,-550.12 606.19,-551.47 629.44,-551.47 637.24,-559.26 637.24,-574.67 629.44,-582.47 627.1,-584.81 627.1,-614.3 627.1,-883.4 693.98,-950.28 1041.88,-950.28 1095.5,-1003.9 1095.5,-1054.16 1097.84,-1056.5 J7.9@1140,-1056.5
USER_IO4_N: J7.12 U1.W6 | length 1988.4
  Top w4.2: U1.W6@267.47,-142.52 v1(283.22,-158.27)
  Layer 2 w4: v1(283.22,-158.27) 283.35,-158.4 294.62,-158.4 297.88,-161.66 297.88,-186.87 313.33,-202.32 316.61,-205.6 347.26,-205.6 353.98,-212.32 365.4,-223.74 365.4,-261.1 610.66,-506.36 615.3,-511 615.3,-516.28 624.2,-525.18 633.35,-525.18 634.7,-526.53 634.7,-532.84 633.35,-534.18 598.21,-534.18 590.3,-542.1 590.3,-557.67 598.21,-565.58 633.35,-565.58 634.7,-566.93 634.7,-573.23 633.35,-574.58 598.21,-574.58 590.3,-582.5 590.3,-598.07 598.21,-605.98 633.35,-605.98 634.7,-607.33 634.7,-613.63 633.35,-614.98 598.21,-614.98 590.3,-622.9 590.3,-638.47 598.21,-646.38 633.35,-646.38 634.7,-647.73 634.7,-654.03 633.35,-655.38 608.1,-655.38 600.18,-663.3 600.18,-678.87 608.1,-686.78 612.96,-686.78 615.3,-689.13 615.3,-734.68 615.3,-967.64 636.78,-989.12 642.68,-995.02 1055.48,-995.02 1085.6,-1025.14 1085.6,-1067.4 1085.6,-1078.4 1083.26,-1080.74 1072.92,-1080.74 1071.57,-1082.09 1071.57,-1088.39 1072.92,-1089.74 1087.45,-1089.74 1088.8,-1091.09 1088.8,-1097.39 1087.45,-1098.74 1072.71,-1098.74 1071.36,-1100.09 1071.36,-1106.39 1072.71,-1107.74 1083.26,-1107.74 1085.6,-1110.09 1085.6,-1122.65 1085.6,-1126.83 1055.93,-1156.5 J7.12@1040,-1156.5
USER_IO4_P: J7.10 U1.V6 | length 1988.3
  Top w4.2: U1.V6@235.98,-142.52 v1(251.72,-158.27)
  Layer 2 w4: v1(251.72,-158.27) 265.72,-144.27 296.33,-144.27 309.08,-157.02 309.08,-182.23 321.25,-194.4 351.9,-194.4 369.82,-212.32 376.6,-219.1 376.6,-256.46 626.5,-506.36 626.5,-511.64 628.84,-513.98 637.99,-513.98 645.9,-521.9 645.9,-537.47 637.99,-545.38 602.85,-545.38 601.5,-546.73 601.5,-553.03 602.85,-554.38 637.99,-554.38 645.9,-562.3 645.9,-577.87 637.99,-585.78 602.85,-585.78 601.5,-587.13 601.5,-593.43 602.85,-594.78 637.99,-594.78 645.9,-602.7 645.9,-618.27 637.99,-626.18 602.85,-626.18 601.5,-627.53 601.5,-633.83 602.85,-635.18 637.99,-635.18 645.9,-643.1 645.9,-658.67 637.99,-666.58 612.73,-666.58 611.38,-667.93 611.38,-674.23 612.73,-675.58 617.6,-675.58 626.5,-684.49 626.5,-734.68 626.5,-963 647.32,-983.82 1060.12,-983.82 1096.8,-1020.5 1096.8,-1128.2 1125.1,-1156.5 J7.10@1140,-1156.5
USER_IO5_N: J7.17 U1.U8 | length 1990.5
  Top w4.2: U1.U8@204.48,-79.53 v1(220.23,-95.28)
  Layer 1 w4: v1(220.23,-95.28) 220.23,-98.52 225.2,-103.49 225.2,-111.94 265.72,-152.47 265.72,-160.57 277.49,-172.34 307.43,-172.34 317.77,-162 361.1,-162 402.32,-203.22 404.2,-205.1 570.5,-371.4 570.5,-388.1 570.5,-581.01 579.29,-589.8 580.64,-591.15 580.64,-597.45 579.29,-598.8 573.72,-598.8 565.93,-606.59 565.93,-622.01 573.72,-629.8 589.33,-629.8 590.68,-631.15 590.68,-637.45 589.33,-638.8 571.49,-638.8 563.7,-646.59 563.7,-662.01 571.49,-669.8 594.15,-669.8 595.5,-671.15 595.5,-677.45 594.15,-678.8 571.59,-678.8 563.8,-686.59 563.8,-702.01 571.59,-709.8 594.15,-709.8 595.5,-711.15 595.5,-717.45 594.15,-718.8 571.09,-718.8 563.3,-726.59 563.3,-742.01 571.09,-749.8 594.15,-749.8 595.5,-751.15 595.5,-757.45 594.15,-758.8 570.59,-758.8 562.8,-766.59 562.8,-782.01 570.59,-789.8 594.15,-789.8 595.5,-791.15 595.5,-797.45 594.15,-798.8 560.17,-798.8 552.38,-806.59 552.38,-822.01 560.17,-829.8 594.15,-829.8 595.5,-831.15 595.5,-837.45 594.15,-838.8 553.29,-838.8 545.5,-846.59 545.5,-862.01 553.29,-869.8 594.15,-869.8 595.5,-871.15 595.5,-877.45 594.15,-878.8 553.29,-878.8 545.5,-886.59 545.5,-902.01 553.29,-909.8 594.15,-909.8 595.5,-911.15 595.5,-917.45 594.15,-918.8 553.29,-918.8 545.5,-926.59 545.5,-942.01 553.29,-949.8 596.34,-949.8 598.34,-951.8 639.38,-992.84 675.36,-992.84 689.51,-992.84 691.86,-995.18 693.21,-996.53 699.51,-996.53 700.86,-995.18 700.86,-991.24 702.21,-989.89 708.51,-989.89 709.86,-991.24 709.86,-1006.49 711.21,-1007.84 717.51,-1007.84 718.86,-1006.49 718.86,-995.18 721.2,-992.84 723.2,-992.84 732.15,-992.84 784.5,-1045.19 784.5,-1054.16 782.16,-1056.5 J7.17@740,-1056.5
USER_IO5_P: J7.15 U1.U9 | length 1989.8
  Top w4.2: U1.U9@204.48,-48.03 v1(220.23,-63.78)
  Layer 1 w4: v1(220.23,-63.78) 222.52,-66.08 222.52,-77.77 236.2,-91.45 236.2,-107.39 273.08,-144.27 289.02,-144.27 297.22,-152.47 297.22,-158.99 299.56,-161.34 302.88,-161.34 313.21,-151 365.66,-151 581.5,-366.84 581.5,-388.1 581.5,-576.46 583.84,-578.8 591.64,-586.59 591.64,-602.01 583.84,-609.8 578.28,-609.8 576.93,-611.15 576.93,-617.45 578.28,-618.8 593.89,-618.8 601.68,-626.59 601.68,-642.01 593.89,-649.8 576.05,-649.8 574.7,-651.15 574.7,-657.45 576.05,-658.8 598.71,-658.8 606.5,-666.59 606.5,-682.01 598.71,-689.8 576.15,-689.8 574.8,-691.15 574.8,-697.45 576.15,-698.8 598.71,-698.8 606.5,-706.59 606.5,-722.01 598.71,-729.8 575.65,-729.8 574.3,-731.15 574.3,-737.45 575.65,-738.8 598.71,-738.8 606.5,-746.59 606.5,-762.01 598.71,-769.8 575.15,-769.8 573.8,-771.15 573.8,-777.45 575.15,-778.8 598.71,-778.8 606.5,-786.59 606.5,-802.01 598.71,-809.8 564.73,-809.8 563.38,-811.15 563.38,-817.45 564.73,-818.8 598.71,-818.8 606.5,-826.59 606.5,-842.01 598.71,-849.8 557.85,-849.8 556.5,-851.15 556.5,-857.45 557.85,-858.8 598.71,-858.8 606.5,-866.59 606.5,-882.01 598.71,-889.8 557.85,-889.8 556.5,-891.15 556.5,-897.45 557.85,-898.8 598.71,-898.8 606.5,-906.59 606.5,-922.01 598.71,-929.8 557.85,-929.8 556.5,-931.15 556.5,-937.45 557.85,-938.8 600.9,-938.8 608.5,-946.4 643.94,-981.84 736.7,-981.84 795.5,-1040.63 795.5,-1054.16 797.84,-1056.5 J7.15@840,-1056.5
USER_IO6_N: J7.18 U1.U5 | length 1986.2
  Top w4.2: U1.U5@204.48,-174.02 204.75,-174.02 220.89,-190.16 v1(221.16,-190.16)
  Layer 2 w4: v1(221.16,-190.16) 222.93,-190.16 229.51,-183.58 237.78,-183.58 266.3,-212.1 269.22,-215.02 269.22,-227.06 277.42,-235.26 289.46,-235.26 310.9,-256.7 570.5,-516.3 570.5,-734.9 570.5,-744.68 579.29,-753.47 594.15,-753.47 595.5,-754.82 595.5,-761.12 594.15,-762.47 570.59,-762.47 562.8,-770.26 562.8,-785.67 570.59,-793.47 594.15,-793.47 595.5,-794.82 595.5,-801.12 594.15,-802.47 553.29,-802.47 545.5,-810.26 545.5,-825.67 553.29,-833.47 594.15,-833.47 595.5,-834.82 595.5,-841.12 594.15,-842.47 553.29,-842.47 545.5,-850.26 545.5,-865.67 553.29,-873.47 594.15,-873.47 595.5,-874.82 595.5,-881.12 594.15,-882.47 553.29,-882.47 545.5,-890.26 545.5,-905.67 553.29,-913.47 594.15,-913.47 595.5,-914.82 595.5,-921.12 594.15,-922.47 553.29,-922.47 545.5,-930.26 545.5,-945.67 553.29,-953.47 594.15,-953.47 595.5,-954.82 595.5,-961.12 594.15,-962.47 553.29,-962.47 545.5,-970.26 545.5,-985.67 553.29,-993.47 594.15,-993.47 595.5,-994.82 595.5,-1001.12 594.15,-1002.47 561.78,-1002.47 553.99,-1010.26 553.99,-1025.67 561.78,-1033.47 568.16,-1033.47 570.5,-1035.81 570.5,-1050.7 570.5,-1068.16 602.02,-1099.68 612.91,-1110.57 666,-1110.57 677,-1110.57 679.34,-1112.91 679.34,-1124.22 680.69,-1125.57 686.99,-1125.57 688.34,-1124.22 688.34,-1108.92 689.69,-1107.57 695.99,-1107.57 697.34,-1108.92 697.34,-1123.25 698.69,-1124.6 704.99,-1124.6 706.34,-1123.25 706.34,-1112.91 708.69,-1110.57 735.8,-1110.57 778.14,-1110.57 781.26,-1113.69 781.26,-1117 741.76,-1156.5 J7.18@740,-1156.5
USER_IO6_P: J7.16 U1.T5 | length 1985.8
  Top w4.2: U1.T5@172.98,-174.02 173.2,-174.02 189.4,-190.21 v1(189.62,-190.21)
  Layer 2 w4: v1(189.62,-190.21) 191.92,-187.92 203.61,-187.92 218.95,-172.58 242.33,-172.58 277.02,-207.26 289.02,-207.26 297.22,-215.46 297.22,-227.46 326.46,-256.7 581.5,-511.74 581.5,-734.9 581.5,-740.12 583.84,-742.47 598.71,-742.47 606.5,-750.26 606.5,-765.67 598.71,-773.47 575.15,-773.47 573.8,-774.82 573.8,-781.12 575.15,-782.47 598.71,-782.47 606.5,-790.26 606.5,-805.67 598.71,-813.47 557.85,-813.47 556.5,-814.82 556.5,-821.12 557.85,-822.47 598.71,-822.47 606.5,-830.26 606.5,-845.67 598.71,-853.47 557.85,-853.47 556.5,-854.82 556.5,-861.12 557.85,-862.47 598.71,-862.47 606.5,-870.26 606.5,-885.67 598.71,-893.47 557.85,-893.47 556.5,-894.82 556.5,-901.12 557.85,-902.47 598.71,-902.47 606.5,-910.26 606.5,-925.67 598.71,-933.47 557.85,-933.47 556.5,-934.82 556.5,-941.12 557.85,-942.47 598.71,-942.47 606.5,-950.26 606.5,-965.67 598.71,-973.47 557.85,-973.47 556.5,-974.82 556.5,-981.12 557.85,-982.47 598.71,-982.47 606.5,-990.26 606.5,-1005.67 598.71,-1013.47 566.34,-1013.47 564.99,-1014.82 564.99,-1021.12 566.34,-1022.47 572.71,-1022.47 581.5,-1031.25 581.5,-1050.7 581.5,-1063.6 617.47,-1099.57 782.7,-1099.57 839.63,-1156.5 J7.16@840,-1156.5
VDD_DIG: C131.2 C206.2 C207.2 C208.2 C209.2 C210.2 C211.2 C226.1 C227.1 C230.1 C231.1 C235.1 C240.1 C297.2 C298.2 L8.1 L9.1 L10.1 L11.1 R76.1 U11.A9 U11.A10 U11.D2 U11.D3 U11.E3 U11.F12 U11.K4 U11.M9 U11.M10 U18.8 U18.9 U18.10 | length 1556.3
  Top w4.2: v1(913.5,136.46) v1@914,135.95 ; U11.M10@914,111.94 U11.M10@914.5,111.44 ; v1(945.5,136.46) v1@945.75,136.2 ; U11.M9@945.75,111.69 U11.M9@946,111.44
  Top w10: R76.1@693.77,611.25 694.54,610.48 694.54,586.26 v1(695.3,585.5) ; v1(803.35,-135) 803.35,-133.38 788.69,-118.71 C131.2@788.69,-93 836.05,-93 U11.F12@851.51,-77.54 ; C211.2@885.34,-297.02 C211.2@880.5,-301.86 880.5,-299.89 889.19,-291.2 L11.1@915,-291.2 ; U11.M10@914,111.94 v1@914,135.95 ; U11.A10@914.5,-235.02 914.75,-235.27 914.75,-259.75 v1(915,-260) L11.1@915,-291.2 ; L11.1@916.64,-291.2 L11.1@915,-291.2 ; v1(938.1,-326.6) 936.95,-325.45 936.95,-313.48 915,-291.53 L11.1@915,-291.2 ; U11.M9@945.75,111.69 v1@945.75,136.2 ; v1(946,-260) U11.A9@946,-235.02 ; C235.1@1024.77,697.25 1029.05,697.25 C235.1@1029.3,697.5 ; v1(1044.8,151.3) 1045.95,152.45 1053.11,152.45 1057.84,157.18 1059.81,157.18 1070.56,167.93 L9.1@1070.56,169.9 ; 1054.3,703.5 1054.3,668.5 v1(1055.3,667.5) ; v1(1069.9,-325.3) 1069.9,-323.68 1072.76,-320.82 L10.1@1072.76,-291.2 ; U11.K4@1103.48,48.45 v1(1119.23,64.2) ; U11.D3@1134.98,-140.53 v1(1150.72,-156.28) ; U11.E3@1134.98,-109.03 v1(1150.72,-124.78) ; U11.D2@1166.47,-140.53 v1(1182.22,-156.28)
  Bottom w10: v1(695.3,585.5) 696.92,585.5 713.92,568.5 1018.3,568.5 1055.3,605.5 v1(1055.3,667.5) ; C298.2@879.5,-286.54 879.65,-286.7 912.34,-286.7 913.85,-285.19 913.85,-261.15 v1(915,-260) ; v1(913.54,169.9) 915.16,169.9 925.16,179.9 C227.1@966.5,179.9 ; v1(938.1,-326.6) 939.25,-325.45 945.06,-325.45 965.54,-304.97 965.54,-303 955.78,-293.24 955.78,-271.4 946,-261.62 v1(946,-260) ; C226.1@1018.5,179.9 1020.46,179.9 1043.65,156.71 1043.65,152.45 v1(1044.8,151.3) ; C231.1@1021.5,-303.98 1048.58,-303.98 v1(1069.9,-325.3) ; C207.2@1070.5,121.77 1086.5,121.77 ; C206.2@1102.5,121.77 1086.5,121.77 ; v1(1119.23,64.2) 1086.5,96.93 1086.5,121.77 ; v1(1150.72,-156.28) 1151.87,-157.42 1151.87,-179.23 C297.2@1155.5,-182.86 ; v1(1150.72,-124.78) v1(1182.22,-156.28) 1183.37,-157.42 1208.74,-157.42 C208.2@1210.31,-159 C209.2@1210.31,-191
  other v1: 939.3,689.5 965.3,689.5 990.3,689.5 1049.3,694.5 1019.3,695.5 939.3,713.5 965.3,713.5 991.3,713.5
VDDA_RX_LO: C212.2 C213.2 C214.2 C215.2 C216.2 C217.2 C218.2 C219.2 C256.1 C257.1 C299.2 C300.2 R86.1 U11.B9 U11.B10 U11.E2 U11.F2 U11.J3 U11.K3 U19.8 U19.9 U19.10 | length 960.3
  Top w9: R86.1@751.98,-853.28 753.19,-854.49 753.19,-878.31 v1(754.39,-879.51) ; v1(1060,-796) 1060,-766
  Top w10: v1@900.5,-220.64 900.5,-219.08 914.5,-205.08 U11.B10@914.5,-203.52 ; v1(930.25,-219.27) U11.B9@946,-203.52 ; U11.J3@1134.98,16.95 v1(1150.72,32.7) ; U11.K3@1134.98,48.45 v1(1150.72,64.2) ; U11.E2@1166.47,-109.07 v1@1182.14,-124.74 ; U11.F2@1166.47,-77.54 v1(1182.22,-93.28)
  Bottom w9: v1(754.39,-879.51) 756.28,-879.51 769.77,-893 1026,-893 1060,-859 v1(1060,-796)
  Bottom w10: v1(899.5,-218.64) 902.58,-221.73 927.79,-221.73 v1(930.25,-219.27) 933.71,-222.73 962,-222.73 C214.2@962.5,-223.23 ; v1(1150.72,32.7) 1151.87,31.55 1168.84,31.55 1175.22,25.17 1177.19,25.17 C213.2@1184.5,17.87 ; v1(1150.72,64.2) 1180.89,64.2 1184.65,67.96 ; C300.2@1170.2,-64.56 1170.2,-79.64 1182.22,-91.66 v1(1182.22,-93.28) 1183.37,-94.43 1207.7,-94.43 C217.2@1209.81,-96.54 1210.31,-97.04 C216.2@1210.31,-127.04 ; v1(1182.14,-124.78) 1183.29,-125.93 1209.2,-125.93 C216.2@1210.31,-127.04 ; C219.2@1185.94,125.46 1184.81,124.33 C218.2@1184.81,84.46 1184.65,84.3 1184.65,67.96 ; C213.2@1187.94,12.46 1184.5,15.9 C213.2@1184.5,17.87 ; C216.2@1210.81,-127.54 C216.2@1210.31,-127.04 ; C213.2@1184.5,17.87 C212.2@1184.5,51.46 1184.65,51.61 1184.65,67.96
  other v1: 932,-774 958,-774 983,-774 1042,-769 1012,-768 932,-750 958,-750 984,-750
VTTREF: C6.2 C7.2 C123.1 C124.1 C127.2 C128.2 C165.1 U1.H6 U1.P6 U2.H1 U2.M8 U3.H1 U3.M8 U20.6 | length 2751.5
  Top w4.2: v1@-222,-905.45 v1(-222,-904.93) ; U2.M8@-206.5,-921.45 U2.M8@-206.5,-920.94 ; U1.P6@109.99,-142.76 U1.P6@109.99,-142.52 ; v1(126,-159) v1@126,-158.76
  Top w6: U3.M8@394.99,-922.73 U3.M8@394.99,-921.45
  Top w10: U20.6@-538.93,-985.37 -538.42,-985.88 -526.17,-985.88 -525.91,-986.15 v1(-506.84,-986.15) -505.69,-987.3 -490.7,-987.3 -484,-994 C165.1@-484,-1023.32 ; v1(-441,-782) -440.72,-782 -427.25,-795.47 U2.H1@-426.98,-795.47 ; v1@-222,-905.45 U2.M8@-206.5,-920.94 ; v1(-94.73,-158.27) U1.H6@-78.98,-142.52 ; U1.P6@109.99,-142.76 v1@126,-158.76 ; v1(163,-780.16) 164.15,-781.3 164.15,-783.55 174.52,-793.92 U3.H1@174.52,-795.47 ; v1(380,-939) 380,-937.72 U3.M8@394.99,-922.73
  Layer 3 w8: v1(-94.73,-158.27) -79,-174 10,-174 ; v1(126,-159) 111,-174 10,-174 ; v1(380,-939) 380,-893.92 342,-855.92 342,-813 325,-796 178.84,-796 v1(163,-780.16) 23.16,-780.16 10,-767 10,-174
  Bottom w8: v1(-441,-782) -440.72,-782 -426.72,-796 -395,-796 -385,-806 -325,-806 -315,-796 -280,-796 -270,-806 -270,-835 -222,-883 v1(-222,-904.93) -221.5,-905.43 -206,-920.93 -141.93,-920.93 -127,-906 -127,-841 -114,-828 -63.93,-828 -23.07,-787.14 27,-787.14 32.86,-793 33.5,-793 92.5,-852 129.16,-852 136.94,-844.22 136.94,-844.06 141,-840 141.28,-840 173,-808.28 C124.1@173,-806.32 175,-804.31 175,-793.78 163,-781.78 v1(163,-780.16)
  Bottom w10: v1(-506.84,-986.15) -501.15,-986.15 -501,-986 -499.96,-986 -462.84,-948.88 -462.84,-837.13 -443.36,-817.65 -443.36,-785.99 -441,-783.62 v1(-441,-782) ; v1@-221.5,-905.43 -221.5,-931.81 C127.2@-221,-932.31 ; C6.2@-110.6,-142.4 v1(-94.73,-158.27) ; v1(126,-159) 126.25,-159 141.15,-173.9 C7.2@141.4,-173.9 ; v1(380,-939) 380,-937.38 384.16,-933.22 384.16,-923.53 C128.2@389,-918.69
pads on no net: B2.5 D4.1 J4.9 J5. J5.A8 J5.B8 J12.A8 J12.B8 S3.1 U1.A10 U1.A12 U1.A14 U1.B12 U1.B13 U1.B14 U1.C6 U1.C12 U1.C13 U1.C15 U1.C16 U1.C18 U1.D15 U1.D16 U1.E6 U1.E13 U1.E16 U1.F12 U1.K9 U1.L10 U1.T9 U1.U7 U1.V5 U1.V7 U1.V10 U1.W11 U1.Y11 U2.J1 U2.J9 U2.L1 U2.L9 U2.M7 U3.J1 U3.J9 U3.L1 U3.L9 U3.M7 U5.8 U5.9 U5.12 U5.13 U6.31 U6.35 U10.21 U10.22 U10.23 U10.24 U10.26 U10.27 U10.28 U10.29 U10.30 U10.32 U10.33 U10.34 U10.36 U10.40 U10.41 U10.43 U10.44 U10.45 U10.46 U10.48 U10.52 U10.53 U10.54 U10.55 U10.57 U10.58 U10.59 U10.60 U11.A3 U11.B3 U11.B4 U11.B5 U11.B6 U11.B7 U11.C3 U11.L5 U11.M3 U11.M11 U12.C4 U14.24 U14.27 U15.7 U16.7 U17.2 U17.3 U18.4 U19.4 U23.1 U24.2 U24.3 U24.4 U24.5 U24.7 U24.8 U24.9 U24.10 U24.16 U24.17 U24.18 U24.21 U24.27 U24.31 U24.78 U25.3@-2287.76,415.24 U25.8@-2254.88,415.24 U26.3@-2284.76,218.87 U26.8@-2251.88,218.87

## Polygon pours and split planes (outlines as drawn)
3V3 on Power "3V3_L07_P011" (solid, pour order 11): -183.5,790.5 -183.5,1363.7 -2454.11,1363.7 -2454.61,1364.2 -2546.4,1364.2 ccw(c-2546.4,1264.2) -2646.4,1264.2 -2646.4,-1264.4 ccw(c-2546.41,-1264.41) -2570.31,-1361.5 -460,-1361.5 -460,-823.8 -533.2,-823.8 -647.2,-937.8 -721.4,-937.8 -721.4,-782.8 -648.5,-709.9 -468.8,-709.9 -468.8,-530.2 -349.45,-410.85 -351.4,-408.9 -351.4,-210.1 387.64,-210.1 321.76,-136.22 -1079.23,-140.13 -1163.9,-224.8 -1562.1,-224.8 -1562.1,92.7 -1078.2,92.7 -983.8,-1.7 -484.8,-1.7 -816.5,330 -816.5,939.3 -527.6,939.3 -527.6,353.5 -309,134.9 70.5,134.9 70.5,310.9 129.2,369.6 129.2,790.5
1V35 on Power "1V35_L07_P010" (solid, pour order 10): -174.75,797.9 -173.25,799.4 129.2,799.4 129.2,1048.6 544.1,1048.6 804.3,788.4 1293.8,788.4 1293.8,-864.6 578.6,-864.6 578.6,-403.7 388.1,-213.2 -343.95,-213.2 -343.95,-415.8 -460.35,-532.2 -460.35,-716.5 -645.15,-716.5 -715.85,-787.2 -714.65,-788.4 -714.65,-934.1 -653.75,-934.1 -536.35,-816.7 -452.85,-816.7 -452.85,-1363.1 -451.13,-1361.38 1937.25,-1361.38 ccw(c1937.25,-1250.43) 2046.17,-1271.54 2046.17,1174.63 ccw(c2046.15,1174.56) 2046.17,1174.5 2049.03,1252.02 ccw(c1937.26,1252.03) 1937.25,1363.8 1913.05,1363.8 1912.65,1363.4 -171.25,1363.4
VDDA_RX_LO on Power "VDDA_RX_LO_L07_P004" (solid, pour order 4): 802.33,-519 1127.7,-519 1127.7,-247.2 1111.6,-231.1 890.5,-231.1 890.5,-172.1 1168.2,-172.1 1168.2,-34.3 1138.8,-4.9 1138.8,135.3 1282.3,135.3 1282.3,-854 801.46,-854
1V0 on Power "1V0_L07_P000" (solid, pour order 0): -805.07,932 -536.1,932 -536.1,348.8 -312.5,125.2 188.73,125.2 188.73,-1.43 189.1,-1.8 -476.6,-1.8 -805.07,326.67
1V8 on Power "1V8_L07_P002" (solid, pour order 2): 141.6,1038.8 141.7,1038.7 141.7,363 77.39,298.69 77.39,134.1 196,134.1 196.5,133.6 196.5,-8.6 -990.8,-8.6 -1082.73,83.33 -1551.02,83.33 -1551.02,-218.42 -1549.4,-216.8 -1168.3,-216.8 -1087.4,-135.9 323.8,-135.9 587.82,-399.92 587.82,-854.2 794.3,-854.2 794.3,781.3 536.9,1038.7 161.3,1038.7
VDD_DIG on Power "VDD_DIG_L07_P006" (solid, pour order 6): 801.7,779.43 1282.25,779.43 1282.25,141.32 1133.6,141.32 1133.6,-9.8 1163.8,-40 1163.8,-166.6 884.7,-166.6 884.7,-236.7 1105.9,-236.7 1121.2,-252 1121.2,-512.6 801.7,-512.6
GND on Layer 1 "GND_L03_P017" (solid, pour order 17): -2393.3,1378.2 -2393,1377.9 1962.7,1377.9 cw(c1962.7,1277.9) 2062.7,1277.9 2062.7,-1278.3 cw(c1962.7,-1278.3) 1962.7,-1378.3 -2562.3,-1378.3 cw(c-2562.3,-1278.3) -2662.3,-1278.3 -2662.3,1277.8 cw(c-2562.3,1277.8) -2562.3,1377.8 -2393.6,1377.8
1V8 on Layer 1 "1V8_L03_P003" (solid, pour order 3): -189.22,125.2 77.3,125.2 94.24,142.14 121.3,169.2 235,169.2 235,-112 188.73,-158.27 -157.72,-158.27 -189.22,-126.77
GND on Layer 3 "GND_L06_P019" (solid, pour order 19): -2393.3,1378.2 -2393,1377.9 1962.7,1377.9 cw(c1962.7,1277.9) 2062.7,1277.9 2062.7,-1278.3 cw(c1962.7,-1278.3) 1962.7,-1378.3 -2562.3,-1378.3 cw(c-2562.3,-1278.3) -2662.3,-1278.3 -2662.3,1277.8 cw(c-2562.3,1277.8) -2562.3,1377.8 -2393.6,1377.8
1V0 on Layer 3 "1V0_L06_P001" (solid, pour order 1): -171.92,125.74 164.96,125.74 231.8,58.9 231.8,-141.8 -129.9,-141.8 -171.85,-99.85
GND on GND 2 "GND_L05_P013" (solid, pour order 13): -2393.3,1378.2 -2393,1377.9 1962.7,1377.9 cw(c1962.7,1277.9) 2062.7,1277.9 2062.7,-1278.3 cw(c1962.7,-1278.3) 1962.7,-1378.3 -2562.3,-1378.3 cw(c-2562.3,-1278.3) -2662.3,-1278.3 -2662.3,1277.8 cw(c-2562.3,1277.8) -2562.3,1377.8 -2393.6,1377.8
GND on GND 1 "GND_L02_P014" (solid, pour order 14): -2393.3,1378.2 -2393,1377.9 1962.7,1377.9 cw(c1962.7,1277.9) 2062.7,1277.9 2062.7,-1278.3 cw(c1962.7,-1278.3) 1962.7,-1378.3 -2562.3,-1378.3 cw(c-2562.3,-1278.3) -2662.3,-1278.3 -2662.3,1277.8 cw(c-2562.3,1277.8) -2562.3,1377.8 -2393.6,1377.8
GND on Bottom "GND_L08_P016" (solid, pour order 16): -2393.3,1378.2 -2393,1377.9 1962.7,1377.9 cw(c1962.7,1277.9) 2062.7,1277.9 2062.7,-1278.3 cw(c1962.7,-1278.3) 1962.7,-1378.3 -2562.3,-1378.3 cw(c-2562.3,-1278.3) -2662.3,-1278.3 -2662.3,1277.8 cw(c-2562.3,1277.8) -2562.3,1377.8 -2393.6,1377.8
GND on Layer 2 "GND_L04_P018" (solid, pour order 18): -2393.3,1378.2 -2393,1377.9 1962.7,1377.9 cw(c1962.7,1277.9) 2062.7,1277.9 2062.7,-1278.3 cw(c1962.7,-1278.3) 1962.7,-1378.3 -2562.3,-1378.3 cw(c-2562.3,-1278.3) -2662.3,-1278.3 -2662.3,1277.8 cw(c-2562.3,1277.8) -2562.3,1377.8 -2393.6,1377.8
GND on Top "GND_L01_P015" (solid, pour order 15): -2393.3,1378.2 -2393,1377.9 1962.7,1377.9 cw(c1962.7,1277.9) 2062.7,1277.9 2062.7,-1278.3 cw(c1962.7,-1278.3) 1962.7,-1378.3 -2562.3,-1378.3 cw(c-2562.3,-1278.3) -2662.3,-1278.3 -2662.3,1277.8 cw(c-2562.3,1277.8) -2562.3,1377.8 -2393.6,1377.8